# Altium PCB 2026.11.05.HMS.PD.CNHH.V5.1.PcbDoc (part 3 of 4)
Units mm, origin at the board's own origin, x right, y up, seen from the top; angles counter-clockwise.
Board outline 110 x 110 mm, 2 copper layers (Top Layer, Bottom Layer); 170 components, 117 nets, 610 pads, 1348 vias.
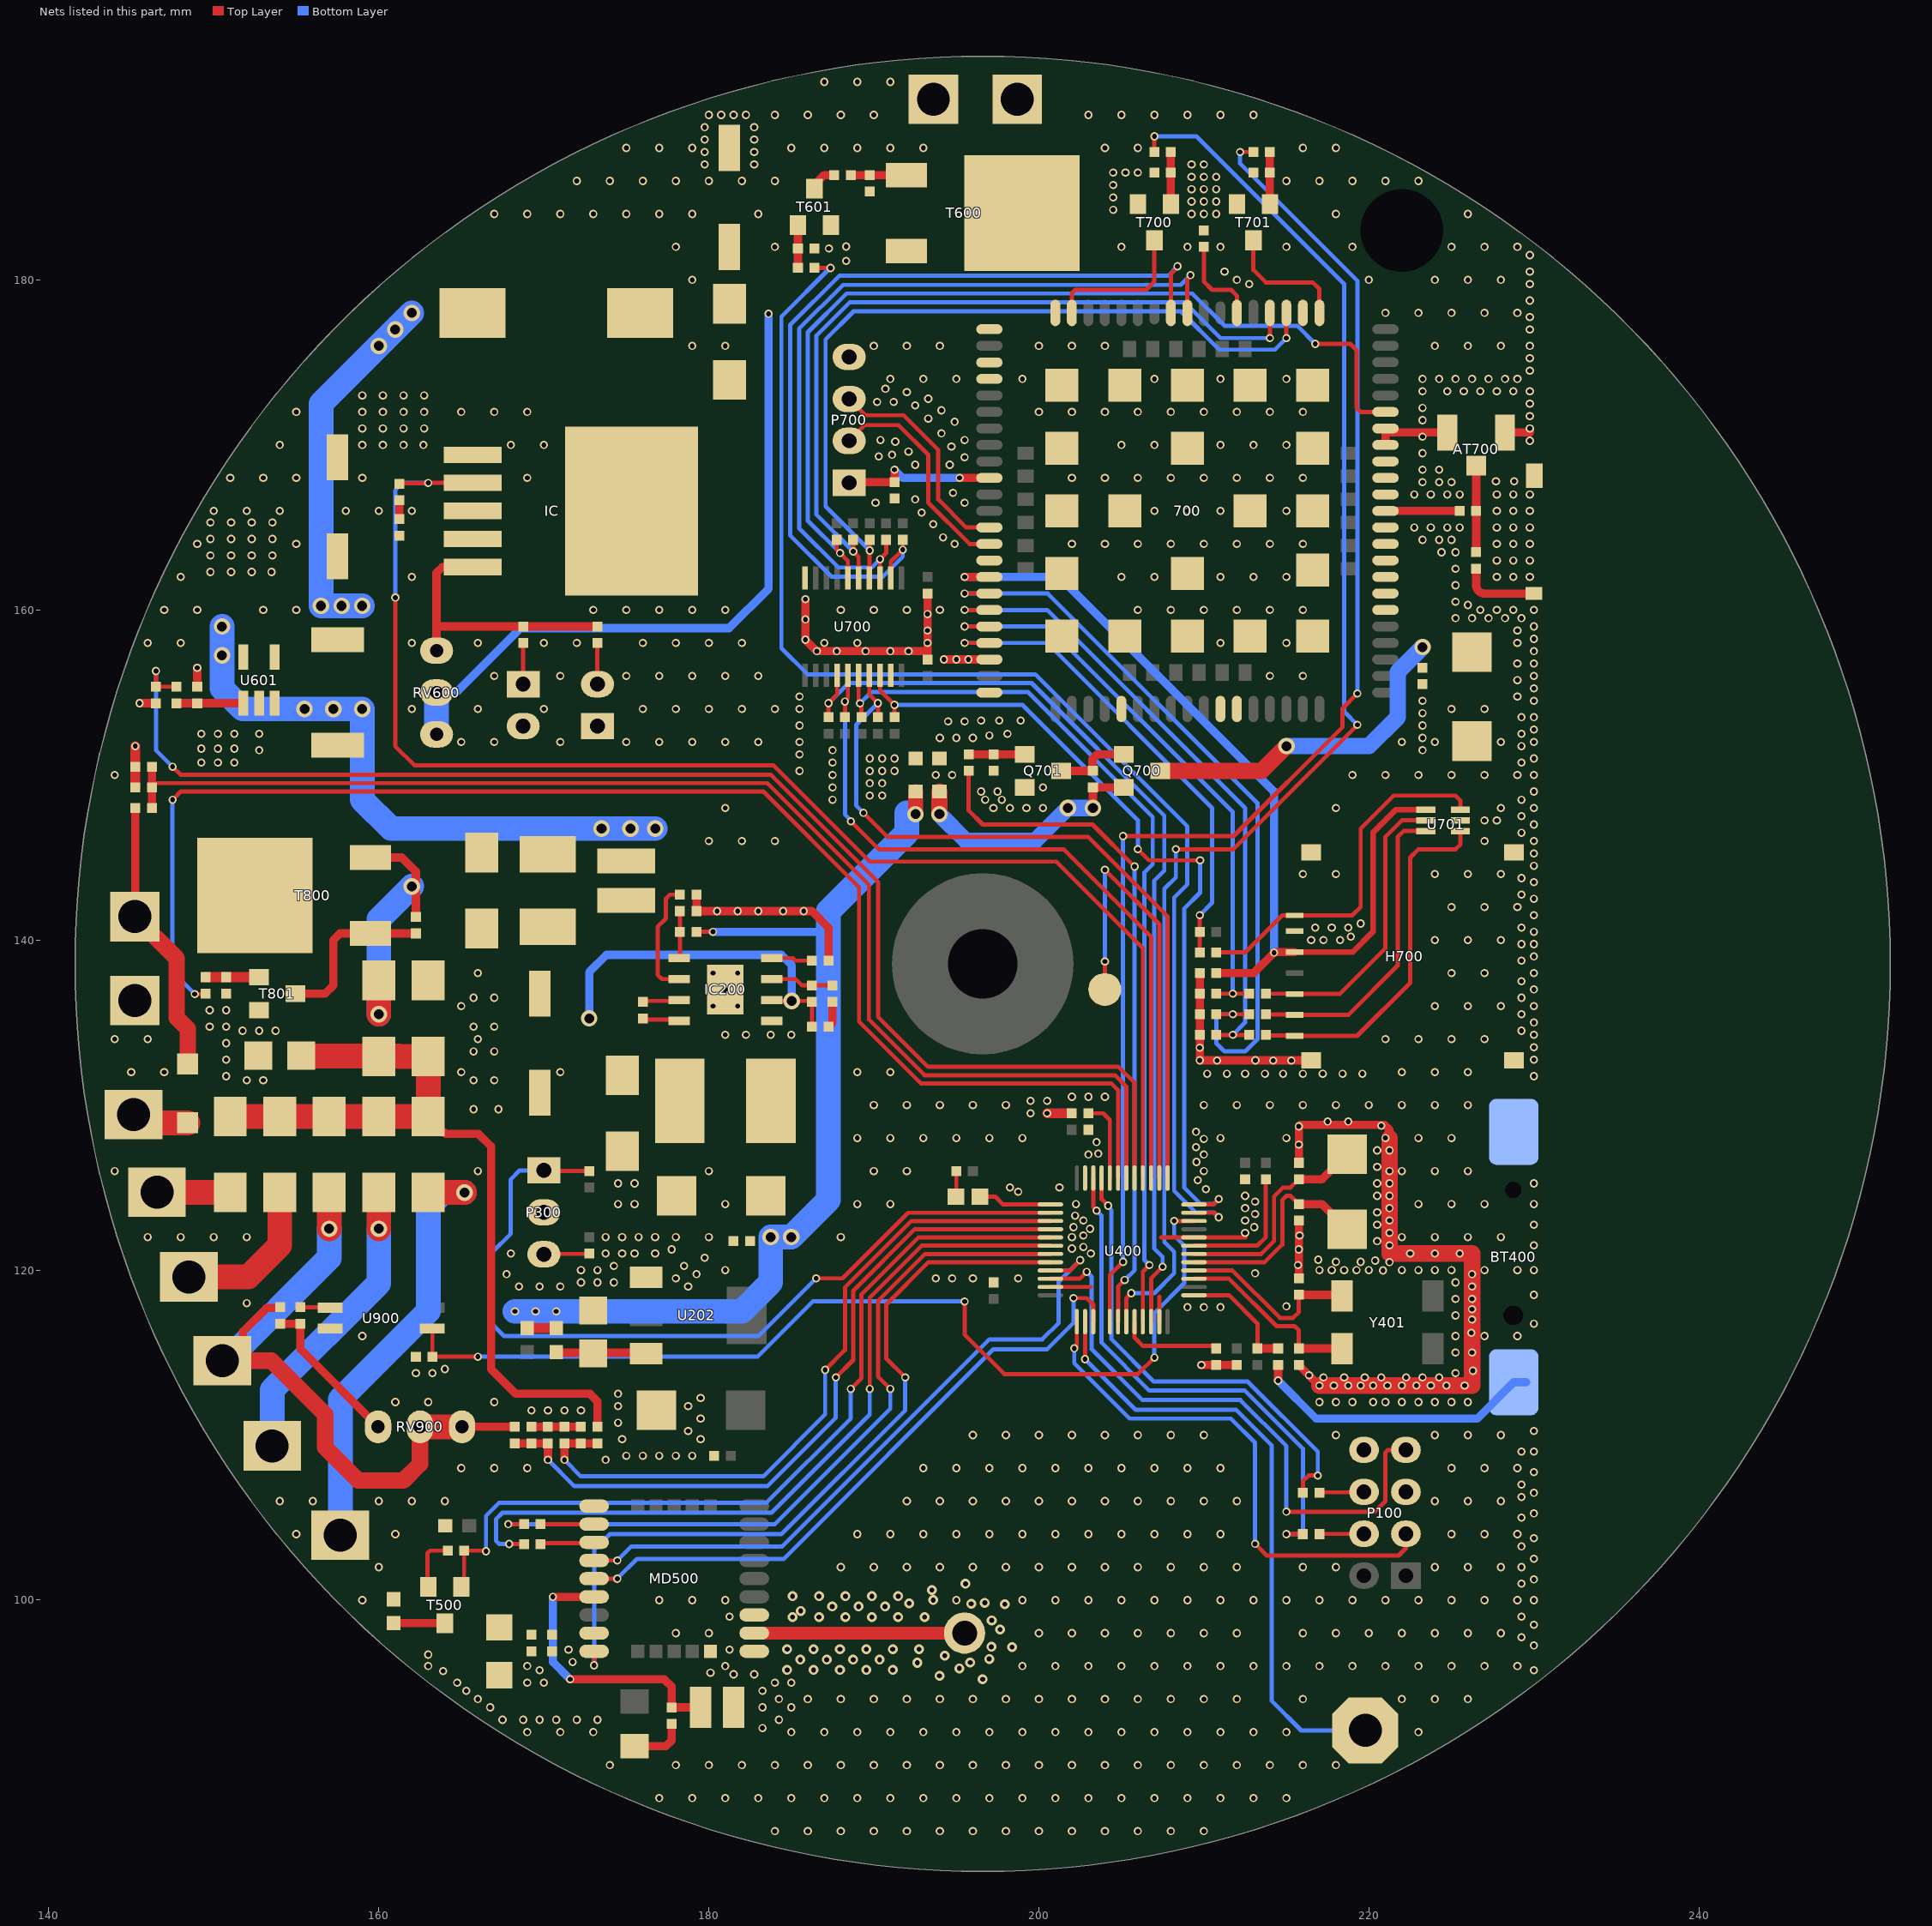
[diagram p2: the nets of this part, all layers, seen from the top]

## Via types
v1: diameter 0.5, hole 0.3, Top Layer to Bottom Layer, tented both sides, 1263 vias
v2: diameter 0.6, hole 0.3, Top Layer to Bottom Layer, tented both sides, 48 vias
v3: diameter 1, hole 0.6, Top Layer to Bottom Layer, tented both sides, 37 vias

## Nets (pads, with @x,y where several pads share a name; then routed paths per layer and width w, separated by ;. In a path a pad name is that pad's centre, name@x,y a point inside that pad or via, vN(x,y) a via of type N, cw(c..) or ccw(c..) an arc to the next point about the centre after c; other vN are vias at no path point) (continued)
GND: BT400.2 C201.1 C202.1 C203.2 C204.2 C205.1 C208.1 C209.2 C400.1 C401.1 C402.1 C403.1 C404.1 C405.1 C406.1 C407.1 C500.1 C501.1 C502.2 C503.2 C600.2 C601.1 C602.2 C603.1 C801.1 C802.2 C803.1 C900.1 D200.1 D.1 IC200.1 IC200.EPAD IC.1 L701.1 MD500.1 MD500.10 MD500.12 MD500.28 P100.5 P100.8 P300.2 P600.2 P601.1 P602.2 P800.2 R201.1 R203.1 R204.1 R205.1 R400.1 R405.1 R605.1 R607.1 R620.1 R803.1 R804.1 R806.1 R901.1 R902.1 T601.2 T801.2 T905.1 U202.1 U400.8 U400.23 U400.35 U400.47 U601.2 U900.2 | length 81.5
  Top Layer w0.254: U400.35@200.7,118.975 203.15,118.975 ; U400.47@207.3,116.875 207.3,118.4 ; 207.4,121.975 U400.8@209.4,121.975 212.525,121.975
  Top Layer w0.5: v1(145.5,154.35) C603.1@146.5,154.35 ; R607.1@149,155.35 v1(149,156.5) ; C601.1@161.25,165.5 R620.1@161.25,166.65 ; C900.1@169.25,110.5 C801.1@172.25,110.5 ; R205.1@179.25,142.75 R203.1@179.25,141.75 v1(180.5,141.75) v1(181.75,141.75) v1(183,141.75) v1(184.5,141.75) v1(185.75,141.75) 186.25,141.75 187.25,140.75 R204.1@187.25,138.75 ; C205.1@187.25,134.75 187.5,135 R201.1@187.5,136.25 ; v1(209.85,114.25) R400.1@210.75,114.25 C407.1@212,114.25 ; C403.1@215.75,114.25 v1(217,113) ; C404.1@215.75,119.5 C401.1@215.75,123 ; C400.1@215.75,126.5 v1(215.75,128.707) 215.843,128.8 220.957,128.8 221.25,128.507 v1@221.25,128 ; v1(221.25,120.475) 221.25,121
  Top Layer w0.6: R804.1@145.25,149.25 C803.1@145.25,150.5 v1(145.25,151.75) ; v1(200.5,129.5) R405.1@202,129.5
  Top Layer w1: v1(217,113) v1(218.75,113) v1(220.25,113) v1(222,113) v1(223.75,113) 226.25,113 v1(226.25,117) v1(226.25,118.25) v1(226.25,119.75) 226.25,121 v1(225.5,121) v1(224,121) v1(222.5,121) 221.25,121 v1(221.25,121.5) v1(221.25,123) v1(221.25,124.5) v1(221.25,126) v1(221.25,127.25) v1@221.25,128
  Top Layer w1.5: T905.1@145.15,129.425 145.65,128.925 D.1@148.425,128.925
  other v1: 184,86 186,86 188,86 190,86 192,86 194,86 196,86 198,86 200,86 202,86 204,86 206,86 208,86 210,86 177,88 179,88 181,88 183,88 185,88 187,88 189,88 191,88 193,88 195,88 197,88 199,88 201,88 203,88 205,88 207,88 209,88 211,88 213,88 215,88 174,90 178,90 180,90 182,90 184,90 186,90 188,90 190,90 192,90 194,90 196,90 198,90 200,90 202,90 204,90 206,90 208,90 210,90 212,90 214,90 216,90 218,90 169,92 171,92 173,92 185,92 187,92 189,92 191,92 193,92 195,92 197,92 199,92 201,92 203,92 205,92 207,92 209,92 211,92 213,92 215,92 223,92 183.25,92.25 167.5,92.75 168.75,92.75 169.75,92.75 170.75,92.75 172,92.75 173.25,92.75 184.25,92.75 166.75,93.5 183.25,93.5 185,93.5 166,94 184.25,94 186,94 188,94 190,94 192,94 194,94 196,94 198,94 200,94 202,94 204,94 206,94 208,94 210,94 212,94 216,94 222,94 224,94 226,94 165.3,94.5 183.25,94.5 164.75,95 169,95 170,95 184,95 185,95 181.5,95.5 182.75,95.5 180.1,95.6 163.9,95.7 169.75,95.75 230,95.75 163,96 169,96 181,96 199,96 201,96 203,96 205,96 207,96 209,96 211,96 213,96 215,96 217,96 219,96 221,96 223,96 225,96 227,96 229,96 171.75,96.25 163,96.7 171.5,97 181.25,97 230,97.25 229.25,97.75 178,98 180,98 200,98 202,98 204,98 206,98 208,98 210,98 212,98 216,98 218,98 220,98 222,98 224,98 226,98 228,98 230,98.5 181.25,99 229.25,99 159,100 177,100 179,100 181,100 195,100 199,100 201,100 203,100 205,100 207,100 209,100 211,100 213,100 215,100 217,100 219,100 221,100 223,100 225,100 227,100 229,100 230,100 229.25,101 230,101.25 160,102 188,102 190,102 192,102 194,102 196,102 198,102 200,102 202,102 204,102 206,102 208,102 210,102 212,102 216,102 218,102 224,102 226,102 228,102 229.25,102 230,102.5 229.25,103.25 230,103.75 155,104 161,104 189,104 191,104 193,104 195,104 197,104 199,104 201,104 203,104 205,104 207,104 209,104 211,104 225,104 227,104 229,104 229.25,105 230,105.25 154,106 156,106 160,106 162,106 164,106 192,106 194,106 196,106 198,106 200,106 202,106 204,106 206,106 208,106 210,106 212,106 224,106 226,106 228,106 229.25,106.25 230,106.5 229.25,107 230,107.75 165,108 167,108 169,108 193,108 195,108 197,108 199,108 201,108 203,108 205,108 207,108 209,108 211,108 225,108 227,108 229,108 173.75,108.5 175,108.75 176,108.75 177,108.75 178,108.75 179,108.75 229.25,109 230,109 174.75,109.75 179.5,109.75 196,110 198,110 200,110 202,110 204,110 206,110 208,110 210,110 218,110 224,110 226,110 228,110 178.75,110.25 230,110.25 174.5,110.75 179.5,111 169.25,111.5 170.25,111.5 171.25,111.5 172.25,111.5 174.5,111.75 178.75,111.75 161,112 163,112 167,112 217,112 218,112 219,112 220.25,112 221,112 222,112 223,112 224,112 225,112 226,112 179.5,112.25 174.5,112.5 217.875,113 219.5,113 221.125,113 222.875,113 224.7,113 225.8,113 217.25,113.5 218.5,113.5 219.75,113.5 220.75,113.5 222.25,113.5 223.25,113.5 224.25,113.5 216.375,113.625 162.25,113.75 163.25,113.75 225.25,113.75 226.3,113.9 164,114 225.25,115 226.25,115 159,116 225.25,116 227,116 229,116 226.2,116.2 230,116.75 225.25,117.25 226.25,117.625 209,117.75 210,117.75 211,117.75 215,117.8 152,118 225.25,118.25 230,118.5 168.5,119 169.75,119 171,119 178.75,119 226.25,119 172.25,119.25 173.25,119.25 174.25,119.25 225.25,119.25 178,119.5 193.75,119.5 194.75,119.5 196,119.5 198.75,119.5 167.75,119.75 179.25,119.75 213.1,119.8 220.85,119.975 172.25,120 173.25,120 181,120 217,120 217.75,120 218.5,120 219.25,120 220,120 222,120 223,120 224,120 225,120 227,120 229,120 230,120 174.25,120.25 178.5,120.25 215.7,120.3 218,120.5 219.5,120.5 220.375,120.575 216.925,120.625 179.75,120.75 168,121 173.75,121 174.75,121 175.5,121 176.75,121 203.15,121 177.75,121.25 215.75,121.25 202,121.3 202.7,121.4 230,121.5 220.5,121.75 146,122 148,122 150,122 152,122 173.75,122 174.75,122 175.75,122 176.75,122 178,122 180,122 188,122 202,122 222,122 224,122 226,122 228,122 202.7,122.1 215.8,122.1 212.5,122.25 221.25,122.25 203.1,122.5 202.1,122.6 213.05,122.6 220.5,122.75 230,122.75 202.7,123 212.5,123 202.2,123.3 213.1,123.4 220.5,123.5 212.5,123.75 221.25,123.75 174.5,124 175.5,124 181,124 189,124 191,124 202.25,124 223,124 225,124 227,124 230,124 213.1,124.15 212.5,124.5 220.5,124.5 198.75,124.75 210.125,124.9 198.25,125 201.25,125 174.5,125.25 175.5,125.25 220.5,125.25 221.25,125.25 230,125.25 209.625,125.45 144,126 166,126 180,126 190,126 192,126 210,126 222,126 224,126 226,126 220.5,126.25 209.55,126.55 203,127 210,127 203.6,127.05 220.5,127.25 209.525,127.45 215.75,127.604 203.5,127.75 210,127.95 189,128 191,128 193,128 195,128 197,128 199,128 211,128 215,128 221,128 223,128 225,128 209.525,128.375 220.75,128.75 217.5,129 218.75,129 199.5,129.5 165.75,129.75 167.25,129.75 190,130 192,130 194,130 196,130 198,130 210,130 212,130 214,130 216,130 218,130 220,130 222,130 224,130 226,130 199.5,130.25 200.5,130.25 202,130.5 203,130.5 204,130.5 152,131.5 153,131.5 165.75,131.5 167,131.5 150.75,131.75 145,132 147,132 165,132 171,132 189,132 191,132 150.75,132.75 165.75,133.25 167,133.25 150.75,133.75 144,134 146,134 166,134 181,134.25 182.25,134.25 183.75,134.25 185,134.25 151.75,134.5 152.75,134.5 153.75,134.5 149.75,134.75 150.75,134.75 165.75,134.75 167,134.75 149.75,135.75 150.75,135.75 165,136 180.25,136 181.75,136 165.75,136.5 167,136.5 181,137 166,138 180.25,138 181.75,138 180,146 182,146 184,146 181,148 187.5,148.5 189.75,148.75 190.5,148.75 187.5,149.25 189.75,149.5 190.5,149.5 144,150 187.5,150 185.5,150.25 189.75,150.25 190.5,150.25 191.25,150.25 149.25,150.75 150.25,150.75 151.25,150.75 187.5,150.75 189.75,151 190.5,151 191.25,151 185.5,151.25 152.75,151.5 187.5,151.5 149.25,151.6 150.25,151.6 151.25,151.6 165,152 167,152 171,152 175,152 177,152 179,152 181,152 183,152 185.5,152 149.25,152.5 150.25,152.5 151.25,152.5 152.75,152.5 185.5,153 162,154 166,154 170,154 176,154 178,154 180,154 182,154 184,154 185.5,154 185.5,154.75 167,156 171,156 175,156 177,156 179,156 181,156 183,156 146,158 148,158 162,158 166,158 170,158 172,158 176,158 178,158 180,158 182,158 147,160 149,160 153,160 155,160 173,160 175,160 177,160 179,160 181,160 148,162 162,162 149.8,162.3 151.05,162.3 152.3,162.3 153.5,162.3 149.8,163.3 151.05,163.3 152.3,163.3 153.55,163.3 149,164 155,164 149.8,164.3 151.05,164.3 152.3,164.3 153.55,164.3 149.8,165.3 151.05,165.3 152.3,165.3 153.55,165.3 150,166 152,166 154,166 158,166 160,166 162,166 151,168 153,168 155,168 159,168 169,168 154,170 159,170 160.25,170 161.5,170 162.7,170 168,170 170,170 159,171 160.25,171 161.5,171 162.75,171 155,172 159,172 160.25,172 161.5,172 162.75,172 165,172 167,172 169,172 159,173 160.25,173 161.5,173 162.75,173 179,176 181,176 179,180 188.325,181.15 187.275,181.9 178,182 184,182 188.325,182.025 167,184 169,184 171,184 173,184 175,184 177,184 179,184 183,184 172,186 174,186 176,186 178,186 180,186 182,186 184,186 179.75,187 182.75,187 179.75,187.75 182.75,187.75 175,188 177,188 179,188 185,188 187,188 189,188 191,188 193,188 179.75,188.5 182.75,188.5 179.75,189.25 182.75,189.25 180,190 180.75,190 181.5,190 182.25,190 184,190 186,190 188,190 190,190 187,192 189,192 191,192
  other v2: 196.596,95.204 193.976,95.416 184.745,95.766 186.345,95.766 187.945,95.766 189.545,95.766 191.145,95.766 195.178,95.861 192.64,96.204 195.84,96.214 185.545,96.39 187.145,96.39 188.745,96.39 190.345,96.39 196.991,96.433 194.297,96.636 184.745,97.027 186.345,97.027 187.945,97.027 189.545,97.027 191.145,97.027 192.745,97.027 198.383,97.154 197.122,97.172 197.652,98.216 197.145,98.772 185.078,98.973 186.678,98.973 188.278,98.973 189.878,98.973 191.478,98.973 193.078,98.973 185.564,99.345 187.478,99.61 189.078,99.61 190.678,99.61 197.937,99.753 195.9,99.778 192.14,99.806 196.724,99.837 193.601,100.001 185.078,100.234 186.678,100.234 188.278,100.234 189.878,100.234 191.478,100.234 193.516,100.613 195.554,100.991
GPS_PWR: L501.1 L502.2 R503.2 T500.2 | length 3.2
  Top Layer w0.254: T500.2@163,100.8 162.95,100.85 162.95,102.851 163.099,103 R503.2@164,103
GPS_VCC: C500.2 C501.2 C502.1 L501.2 MD500.8 T500.3 | length 3.1
  Top Layer w0.5: L501.2@160.9,98.6 T500.3@164,98.6
GSM.DTR: 700.3 R719.1 U700.4 | length 47.6
  Top Layer w0.254: U700.4@189.725,161.95 189.737,161.962 189.737,164.238 R719.1@189.75,164.25 ; v1(215,176.475) 700.3@215,178
  Bottom Layer w0.254: v1(189.75,163.6) 187.075,166.275 187.075,176.4 188.775,178.1 208.6,178.1 210.925,175.775 214.3,175.775 v1(215,176.475)
GSM.GND: 700.2 700.17 700.18 700.29 700.39 700.45 700.46 700.54 700.58 700.59 700.61 700.62 700.63 700.64 700.65 700.69 700.70 700.71 700.72 700.73 700.74 700.75 700.76 700.77 700.78 700.79 700.80 700.81 700.82 700.83 700.84 700.85 700.86 700.87 700.88 700.89 700.91 700.92 700.94 AT700.2 AT701.2 C701.2 C703.1 C704.1 C705.1 C706.1 C707.1 C708.1 C709.1 C730.2 H700.5 L701.2 P700.4 Q701.2 R700.1 R707.1 R709.2 R711.2 T700.2 T701.2 U700.10 U700.19 U701.2 | length 35.2
  Top Layer w0.5: v1(185.85,160.65) v1(185.85,158.2) v1(186.55,157.5) v1(191,157.5) 193.2,157.5 193.25,157.55 ; C705.1@193.25,157 193.25,157.55 ; C704.1@193.25,161 193.25,157.55 ; v1(194.25,157) 700.92@197,157 ; C706.1@209.75,138 C707.1@209.75,136.75 C709.1@209.75,135.5 C708.1@209.75,134.25 v1(209.75,132.71) H700.5@216.5,132.71 ; 700.64@221,170 221,170.75 AT700.2@224.75,170.75 ; AT700.2@228.25,170.75 229.75,170.75 v1(229.75,171)
  other v1: 230,131.75 210.2,131.9 211.4,131.9 212.5,131.9 213.7,131.9 214.8,131.9 216,131.9 217.2,131.9 218.4,131.9 219.6,131.9 222,132 224,132 226,132 210.8,132.7 214.2,132.7 215.3,132.7 213.125,132.71 230,132.75 209.75,133.48 230,133.5 221,134 223,134 225,134 227,134 230,134.25 229.25,134.5 230,135 229.25,135.5 224,136 226,136 228,136 230,136 229.25,136.5 230,137 229.25,137.5 225,138 227,138 230,138 229.25,138.75 230,139 229.25,139.75 230,139.75 216.5,140 217.25,140 218.25,140 224,140 226,140 228,140 218.9,140.2 230,140.5 216.75,140.75 217.75,140.75 218.75,140.75 229.25,140.75 219.5,141 230,141.5 225,142 227,142 229,142 230,142.5 229.25,142.75 230,143.5 229.25,143.75 216,144 218,144 224,144 226,144 228,144 230,144.5 230,145.25 227,146 230,146 229.25,146.5 230,147 227,147.25 227.75,147.25 229.25,147.5 197.25,148 198.25,148 199.25,148 200.25,148 218,148 228,148 230,148 196.75,148.5 197.75,148.5 229.25,148.5 196.5,149 197.5,149 230,149 200.25,149.25 193.75,150 194.75,150 219,150 221,150 223,150 225,150 227,150 229,150 230,150 229.25,150.75 230,151 223.25,151.5 229.25,151.75 222,152 224,152 228,152 230,152 194,152.25 195,152.25 196,152.25 223.25,152.25 197,152.4 198.1,152.5 229.25,152.5 230,152.75 223.25,153 194.5,153.25 195.5,153.25 196.5,153.3 197.6,153.3 198.9,153.3 229.25,153.5 230,153.5 223.25,153.75 225,154 227,154 223.25,154.5 230,154.5 229,154.75 230,155.25 229,155.75 214,156 216,156 230,156 229,156.75 230,156.75 195,157 195.725,157 187.75,157.5 189.5,157.5 192.1,157.5 230,157.5 187,158 189,158 193.25,158 211,158 215,158 229,158 230,158.25 193.25,158.75 229,158.75 230,159 185.85,159.425 225.25,159.5 226.25,159.5 227.25,159.5 228.25,159.5 229.25,159.5 193.25,159.75 188,160 190,160 192,160 194,160 206,160 208,160 210,160 212,160 214,160 216,160 226.75,160 227.75,160 228.75,160 230,160 226,160.3 225.25,160.5 225.25,161.5 205,162 207,162 211,162 213,162 215,162 227.75,162 228.75,162 229.75,162 225.25,162.5 227.75,163 228.75,163 229.75,163 224.4,163.5 225.25,163.5 194.9,164 202,164 204,164 206,164 208,164 210,164 212,164 214,164 216,164 227.75,164 228.75,164 229.75,164 223.25,164.25 224.25,164.25 225,164.25 194.2,164.4 222.75,165 223.75,165 224.75,165 225.5,165 227.75,165 228.75,165 229.75,165 193.6,165.2 192.9,165.9 207,166 209,166 211,166 215,166 227.75,166 228.75,166 229.75,166 190.1,166.5 195.5,166.5 192.5,166.7 222.75,167 223.75,167 224.75,167 225.5,167 227.75,167 228.75,167 229.75,167 194.8,167.1 223.25,167.75 224.25,167.75 225,167.75 227.7,167.8 228.8,167.8 202,168 204,168 206,168 208,168 210,168 212,168 214,168 216,168 223.25,168.5 224.25,168.5 192.5,168.8 194.6,168.8 195.5,169.25 190.3,169.3 191.1,169.4 223.25,169.5 192.1,169.6 194.7,169.9 205,170 207,170 211,170 213,170 215,170 191.3,170.2 229.75,170.25 190.4,170.3 195.5,170.3 223.25,170.5 194.1,170.7 194.9,171.4 223.25,171.5 193.3,171.6 229.75,171.75 200,172 202,172 204,172 206,172 208,172 210,172 212,172 214,172 216,172 194.1,172.1 223.25,172.25 192.5,172.4 229.75,172.5 190.2,172.6 191.2,172.6 193.3,172.8 192,173.2 223.25,173.25 224.75,173.25 225.75,173.25 226.75,173.25 227.75,173.25 228.75,173.25 229.75,173.25 190.7,173.4 191,174 193,174 195,174 199,174 207,174 211,174 215,174 223.25,174 224.25,174 225.25,174 226.25,174 227.25,174 228.25,174 229,174 229.75,174.5 229.75,175.25 190,176 192,176 194,176 200,176 202,176 204,176 224,176 226,176 228,176 229.75,176 229.75,177 229.75,177.75 221,178 223,178 225,178 227,178 229,178 229.75,178.75 212.75,179.75 229.75,179.75 212,180 220,180 224,180 226,180 228,180 211.25,180.5 229.75,180.5 229.75,181.5 205,182 209,182 211,182 215,182 219,182 225,182 227,182 229,182 209.25,184 210,184 210.75,184 218,184 226,184 204.5,184.25 209.25,184.75 210,184.75 210.75,184.75 204.5,185 209.25,185.5 210,185.5 210.75,185.5 204.5,185.75 215,186 217,186 219,186 221,186 223,186 209.25,186.25 210,186.25 210.75,186.25 204.5,186.5 205.25,186.5 206,186.5 209.25,187 210,187 204,188 206,188 216,188 218,188 203,190 205,190 207,190 209,190 211,190 213,190
GSM.PWR: L700.2 Q700.2 R705.2 | length 15.3
  Top Layer w0.5: R705.2@203.25,149.25 Q700.2@205.15,149.25 ; v3(203.275,148) R705.2@203.275,149.25
  Top Layer w1: v3(193.973,147.627) L700.2@193.973,149
  Bottom Layer w1: v3(193.973,147.627) 195.6,146 199.75,146 v3(201.75,148) v3@203.25,148
GSM.PWRKEY: 700.1 T701.3 | length 7.7
  Top Layer w0.254: T701.3@213,182.4 213,180.6 213.75,179.85 216.6,179.85 217,179.45 700.1@217,178
GSM.RESET: 700.16 T700.3 | length 9
  Top Layer w0.254: 700.16@202,178 202,179.2 202.2,179.4 206.5,179.4 207,179.9 T700.3@207,182.4
GSM.RI: 700.4 R717.1 U700.5 | length 47.2
  Top Layer w0.254: R717.1@188.75,164.25 v1(188.75,163.55) 189.075,163.225 U700.5@189.075,161.95 ; v1(214,176.475) 700.4@214,178
  Bottom Layer w0.254: v1(188.75,163.55) 186.525,165.775 186.525,176.628 188.547,178.65 208.828,178.65 211.003,176.475 v1(214,176.475)
GSM.Status: 700.66 R718.1 U700.6 | length 57.8
  Top Layer w0.254: R718.1@187.75,164.25 187.75,163.65 v1(187.95,163.45) 188.425,162.975 U700.6@188.425,161.95 ; v1(216.75,176.125) 218.875,176.125 219.25,175.75 219.25,172.25 219.5,172 700.66@221,172
  Bottom Layer w0.254: v1(187.95,163.45) 186,165.4 186,176.825 188.35,179.175 209.3,179.175 211.25,177.225 215.65,177.225 v1(216.75,176.125)
GSM.VBAT: 700.55 700.56 700.57 C703.2 C730.1 Q700.3 | length 20.6
  Top Layer w1: Q700.3@207.35,150.25 213.5,150.25 v3(215,151.75)
  Bottom Layer w1: v3(215,151.75) 220,151.75 221.75,153.5 221.75,156.25 v3(223.25,157.75)
LED: D400.2 U400.25 | length 4.5
  Top Layer w0.254: D400.2@196.425,124.45 197.35,124.45 197.825,123.975 U400.25@200.7,123.975
LED_PWR: C600.1 D600.2 R602.2 RV600.2 RV600.3 T600.3 | length 41.9
  Bottom Layer w0.5: RV600.2@163.5,155 163.596,155.096 164.796,155.096 168.6,158.9 181.225,158.9 183.625,161.3 v1(183.625,177.95)
  Bottom Layer w1.5: RV600.3@163.5,152.46 RV600.2@163.5,155
LED_VCC: C601.2 C602.1 IC.4 L601.1 R603.2 U601.4 | length 22.5
  Bottom Layer w1.5: v3(159,160.25) v3(157.75,160.25) v3(156.5,160.25) 156.5,172.5 v3(162,178)
  other v3: 160,176 161,177
Net700_60: 700.60 C700.2 | length 4.5
  Top Layer w0.5: 700.60@221,166 C700.2@225.5,166
Net`_2: `.2 P300.3 | length 2.8
  Top Layer w0.254: P300.3@170,120.96 170.02,120.98 172.73,120.98 `.2@172.75,121
NetAT500_1: AT500.1 MD500.11 | length 12.8
  Top Layer w0.8: MD500.11@182.75,98 AT500.1@195.5,98
NetAT700_1: AT700.1 C700.1 R777.2 | length 8
  Top Layer w0.35: C700.1@226.5,166 AT700.1@226.5,168.75
  Top Layer w0.5: R777.2@226.5,163.5 C700.1@226.5,166 AT700.1@226.5,168.75
NetAT701_1: AT701.1 R777.1 | length 4.8
  Top Layer w0.5: R777.1@226.5,162.5 226.5,161.5 ccw(c227,161.5) 227,161 AT701.1@230,161
NetC200_1: C200.1 D200.2 IC200.8 L201.1 | length 2.3
  Top Layer w0.254: C200.1@176,135.25 176.077,135.173 178.119,135.173 IC200.8@178.196,135.095
NetC200_2: C200.2 IC200.7 | length 2.2
  Top Layer w0.254: C200.2@176,136.25 176.057,136.308 178.139,136.308 IC200.7@178.196,136.365
NetC201_2: C201.2 L202.2 U202.3 | length 5.5
  Top Layer w0.5: L202.2@170.75,115.027 170.789,114.989 176.163,114.989 U202.3@176.202,114.95
NetC204_1: C204.1 C205.2 IC200.2 L200.2 R200.2 | length 21.9
  Top Layer w0.254: IC200.2@183.803,136.365 183.861,136.307 v3(185.027,136.307) 186.192,136.307 R200.2@186.25,136.25 C205.2@186.25,134.75
  Bottom Layer w0.5: v3(172.75,135.25) 172.75,138.05 173.8,139.1 184.4,139.1 185.027,138.473 v3(185.027,136.307)
NetC503_1: C503.1 MD500.6 R502.1 | length 17.3
  Top Layer w0.5: v1(170.55,100.2) MD500.6@173.05,100.2 ; v1(171.6,95.2) 177.3,95.2 177.75,94.75 R502.1@177.75,93.5 C503.1@179.5,93.5
  Bottom Layer w0.5: v1(170.55,100.2) 170.55,96.25 v1(171.6,95.2)
NetC603_2: C603.2 R606.2 U400.17 | length 85.2
  Top Layer w0.254: v1(146.5,156.3) C603.2@146.5,155.35 R606.2@147.75,155.35 ; v1(147.5,150.5) 147.984,150.016 148.4,150.016 183.484,150.016 183.759,150.016 190.25,143.525 190.25,135.35 193.284,132.316 204.821,132.316 205.8,131.337 U400.17@205.8,125.575
  Bottom Layer w0.254: v1(146.5,156.3) 146.5,151.5 v1(147.5,150.5)
NetC801_2: C801.2 R800.1 R803.2 U400.27 | length 43.1
  Top Layer w0.254: v1(187.052,113.952) 188.25,115.15 188.25,118.943 192.282,122.975 U400.27@200.7,122.975
  Top Layer w0.5: v1(171.25,108.5) R803.2@171.25,109.5 R800.1@173.25,109.5
  Bottom Layer w0.254: v1(171.25,108.5) 172.25,107.5 183.3,107.5 187.052,111.252 v1(187.052,113.952)
NetC803_2: C803.2 R802.1 R804.2 U400.18 | length 79.5
  Top Layer w0.254: R804.2@146.25,149.508 182.992,149.508 183.542,149.508 189.7,143.35 189.7,135.182 193.074,131.808 204.61,131.808 205.3,131.118 U400.18@205.3,125.575
  Top Layer w0.5: R802.1@146.25,148 146.25,148.5 146.25,149.508 C803.2@146.25,150.5
NetC900_2: C900.2 R900.1 R901.2 U400.28 | length 44.5
  Top Layer w0.254: v1(187.696,113.496) 188.75,114.55 188.75,118.736 192.489,122.475 U400.28@200.7,122.475
  Top Layer w0.5: R900.1@168.25,109.5 R901.2@170.25,109.5 v1(170.25,108.5)
  Bottom Layer w0.254: v1(170.25,108.5) 171.85,106.9 183.549,106.9 187.696,111.048 v1(187.696,113.496)
NetD400_1: D400.1 R404.2 | length 1.6
  Top Layer w0.254: D400.1@194.975,124.45 195,124.475 R404.2@195,126
NetD500_2: D500.2 R502.2 | length 3.4
  Top Layer w0.5: D500.2@175.5,91.15 177.4,91.15 177.75,91.5 R502.2@177.75,92.5
NetD600_1: D600.1 IC.3 IC.6 L601.2
NetD800_2: D800.2 R801.2 T800.3 | length 16.5
  Top Layer w0.5: T800.3@159.5,145 161.4,145 162.25,144.15 R801.2@162.25,141.4
  Top Layer w1.5: v3(160,135.5) D800.2@160,137.55
  Bottom Layer w1.5: v3(160,135.5) 160,141.25 v3(162,143.25)
NetD900_1: D900.1 T900.1 | length 4.4
  Top Layer w1.5: T900.1@146.558,124.714 146.565,124.707 150.993,124.707 D900.1@151,124.7
NetD902_1: D902.1 T901.1 | length 9.5
  Top Layer w1.5: T901.1@148.488,119.583 152.083,119.583 154,121.5 D902.1@154,124.7
NetD905_1: D905.1 T903.1 | length 18
  Top Layer w1.5: v3(160,122.5) D905.1@160,124.7
  Bottom Layer w1.5: T903.1@153.543,109.347 153.543,112.743 160,119.2 v3(160,122.5)
NetD906_1: D906.1 T904.1 | length 26.9
  Top Layer w1.5: D906.1@163,124.7 v3(165.2,124.7)
  Bottom Layer w1.5: T904.1@157.671,103.937 157.671,112.17 163,117.5 163,123.821 163.879,124.7 v3(165.2,124.7)
NetH700_2: H700.2 R712.2 U701.5 | length 18
  Top Layer w0.254: R712.2@213.75,136.75 215.48,136.75 H700.2@215.5,136.73 218.23,136.73 221,139.5 221,146.25 222,147.25 U701.5@223.45,147.25
NetH700_3: H700.3 R713.2 U701.1 | length 21.9
  Top Layer w0.254: R713.2@213.75,134.25 213.78,134.22 215.47,134.22 H700.3@215.5,134.19 219.282,134.19 222.5,137.408 222.5,145 223,145.5 225.25,145.5 225.55,145.8 U701.1@225.55,146.6
NetH700_7: H700.7 R715.2 U701.6 | length 18.9
  Top Layer w0.254: R715.2@213.75,135.5 213.77,135.48 215.48,135.48 H700.7@215.5,135.46 218.756,135.46 221.75,138.454 221.75,146.25 222.1,146.6 U701.6@223.45,146.6
NetH700_8: H700.8 R714.2 U701.3 | length 22.2
  Top Layer w0.254: R714.2@210.75,139.25 212.5,139.25 214.74,141.49 H700.8@215.5,141.49 218.99,141.49 219.5,142 219.5,146.75 221.5,148.75 225.25,148.75 225.55,148.45 U701.3@225.55,147.9
NetIC200_3: IC200.3 R200.1 R201.2 | length 3.9
  Top Layer w0.254: IC200.3@183.803,137.635 185.265,137.635 185.65,137.25 R201.2@187.5,137.25
NetIC200_4: IC200.4 R204.2 | length 2.5
  Top Layer w0.254: IC200.4@183.803,138.905 185.095,138.905 185.25,138.75 R204.2@186.25,138.75
NetIC200_5: IC200.5 R202.1 R203.2 | length 2.9
  Top Layer w0.254: IC200.5@178.196,138.905 178.25,138.959 R203.2@178.25,141.75
NetIC200_6: IC200.6 R205.2 | length 7.2
  Top Layer w0.254: IC200.6@178.139,137.692 IC200.6@178.196,137.635 177.165,137.635 176.9,137.9 176.9,140.8 177.4,141.3 177.4,142.5 177.65,142.75 R205.2@178.25,142.75
NetIC_2: IC.2 R620.2 U400.16 | length 86.4
  Top Layer w0.254: v1(161,160.75) 161,151.75 162.175,150.575 183.925,150.575 189.75,144.75 201.05,144.75 206.3,139.5 U400.16@206.3,125.575 ; R620.2@161.25,167.65 161.275,167.675 162.975,167.675 v1(163,167.7) IC.2@165.685,167.7
  Bottom Layer w0.254: v1(161,160.75) 161,167.25 161.45,167.7 v1(163,167.7)
NetIC_5: IC.5 R600.2 R601.2 RV600.1 | length 17.1
  Top Layer w0.5: RV600.1@163.5,157.54 163.5,159 ; IC.5@165.435,162.35 IC.5@165.685,162.6 163.85,162.6 163.5,162.25 163.5,159 ; R600.2@173.25,159 163.5,159
NetMD500_2: MD500.2 R500.1 | length 3.3
  Top Layer w0.254: R500.1@169.8,104.6 MD500.2@173.05,104.6
NetMD500_3: MD500.3 R501.1 | length 3.3
  Top Layer w0.254: R501.1@169.8,103.4 169.85,103.45 173,103.45 MD500.3@173.05,103.5
NetMD500_4: MD500.4 U400.33 | length 40.5
  Top Layer w0.254: MD500.4@173.05,102.4 v1(174.457,102.4) ; U400.33@200.7,119.975 201.875,119.975 v1(202.5,120.6)
  Bottom Layer w0.254: v1(174.457,102.4) 175.307,103.25 184.45,103.25 197,115.8 200.2,115.8 201.2,116.8 201.2,119.3 v1(202.5,120.6)
NetMD500_5: MD500.5 U400.39 | length 39.4
  Top Layer w0.254: MD500.5@173.05,101.3 v1(174.457,101.3) ; v1(202.1,118.3) 202.9,118.3 203.3,117.9 U400.39@203.3,116.875
  Bottom Layer w0.254: v1(174.457,101.3) 175.657,102.5 184.549,102.5 197.249,115.2 200.5,115.2 202.1,116.8 v1(202.1,118.3)
NetMD500_9: MD500.9 U400.32 | length 48.2
  Top Layer w0.254: v1(173.05,96.05) MD500.9@173.05,96.9 ; v1(191.9,113.496) 190.75,114.646 190.75,117.907 193.318,120.475 U400.32@200.7,120.475
  Bottom Layer w0.254: v1@173.05,95.95 v1(173.05,96.05) 173.05,103.05 174,104 184.4,104 191.9,111.5 v1(191.9,113.496)
NetP100_3: P100.3 U400.37 | length 32.2
  Top Layer w0.254: v1(202.146,115.254) 202.3,115.407 U400.37@202.3,116.875 ; v1(213.1,103.408) 213.808,102.7 221.8,102.7 222.24,103.14 P100.3@222.24,104.02
  Bottom Layer w0.254: v1(202.146,115.254) 202.146,114.354 205.5,111 211.635,111 213.1,109.535 v1(213.1,103.408)
NetP100_4: P100.4 R102.1 | length 2.7
  Top Layer w0.254: R102.1@217,104 217.01,104.01 219.69,104.01 P100.4@219.7,104.02
NetP100_6: P100.6 R100.1 | length 2.7
  Top Layer w0.254: R100.1@217,106.5 217.03,106.53 219.67,106.53 P100.6@219.7,106.56
NetP100_7: P100.7 U400.34 | length 35.9
  Top Layer w0.254: U400.34@200.7,119.475 202.475,119.475 v1(202.896,119.896) ; v1(215,105.354) 220.354,105.354 221,106 221,108.951 221.149,109.1 P100.7@222.24,109.1
  Bottom Layer w0.254: v1(202.896,119.896) 203.2,119.591 203.2,115.2 206.275,112.125 212.208,112.125 215,109.333 v1(215,105.354)
NetP300_1: P300.1 R300.1 U400.26 | length 51.4
  Top Layer w0.254: P300.1@170,126.04 170.04,126 R300.1@172.75,126 ; v1(186.5,119.5) 188.1,119.5 192.075,123.475 U400.26@200.7,123.475
  Bottom Layer w0.254: P300.1@170,126.04 168.54,126.04 168,125.5 168,122.2 166.9,121.1 166.9,116.7 167.6,116 183,116 v1(186.5,119.5)
NetP600_1: P600.1 T600.2
NetP601_2: P601.2 R600.1 | length 2.5
  Top Layer w0.254: P601.2@173.25,155.5 R600.1@173.25,158
NetP602_1: P602.1 R601.1 | length 2.5
  Top Layer w0.254: P602.1@168.75,155.5 R601.1@168.75,158
NetQ700_1: Q700.1@205.15,151.25 Q701.3 R705.1 | length 4.6
  Top Layer w0.5: Q701.3@201.35,150.25 203.25,150.25 203.25,150.957 203.543,151.25 Q700.1@205.15,151.25
NetQ701_1: Q701.1@199.15,151.25 R706.1 R707.2 | length 3.4
  Top Layer w0.5: R706.1@195.75,151.25 R707.2@197.25,151.25 Q701.1@199.15,151.25
NetR100_2: R100.2 U400.21 | length 28.5
  Top Layer w0.254: U400.21@203.8,125.575 203.8,124.3 v1(204.2,123.9) ; R100.2@216,106.5 216,107.2 216.35,107.55 v1(216.9,107.55)
  Bottom Layer w0.254: v1(204.2,123.9) 204.2,123.833 204.4,123.633 204.4,115.809 206.959,113.25 212.65,113.25 216.9,109 v1(216.9,107.55)
NetR102_2: R102.2 U400.22 | length 32
  Top Layer w0.254: U400.22@203.3,125.575 203.3,123.8 v1(203.5,123.6) ; v1(215,104) R102.2@216,104
  Bottom Layer w0.254: v1(203.5,123.6) 203.8,123.3 203.8,115.6 206.7,112.7 212.482,112.7 216,109.182 216,104.3 215.7,104 v1(215,104)
NetR400_2: R400.2 U400.44 | length 6.1
  Top Layer w0.254: U400.44@205.8,116.875 205.8,115.9 206.3,115.4 R400.2@210.75,115.4
NetR401_1: R401.1 U400.7 | length 8.1
  Top Layer w0.254: U400.7@209.4,121.475 213.225,121.475 213.75,122 R401.1@213.75,125.5
NetR402_2: R402.2 R403.2 U400.1 | length 7.3
  Top Layer w0.254: U400.1@209.4,118.475 211.525,118.475 213.25,116.75 R403.2@213.25,115.25
  Top Layer w0.5: R403.2@213.25,115.25 R402.2@214.5,115.25
NetR405_2: R405.2 U400.20 | length 5
  Top Layer w0.254: R405.2@203,129.5 203.9,129.5 204.3,129.1 U400.20@204.3,125.575
NetR500_2: R500.2 U400.31 | length 45.5
  Top Layer w0.254: v1(167.85,104.6) R500.2@168.8,104.6 ; v1(191,112.8) 190.25,113.55 190.25,118.114 193.111,120.975 U400.31@200.7,120.975
  Bottom Layer w0.254: v1(167.85,104.6) 184,104.6 191,111.6 v1(191,112.8)
NetR501_2: R501.2 U400.30 | length 47.7
  Top Layer w0.254: v1(167.9,103.4) R501.2@168.8,103.4 ; v1(189.75,112.8) 189.75,118.322 192.903,121.475 U400.30@200.7,121.475
  Bottom Layer w0.254: v1(167.9,103.4) 167.3,103.4 167.1,103.6 167.1,104.9 167.5,105.3 183.8,105.3 189.75,111.25 v1(189.75,112.8)
NetR503_1: R503.1 T500.1@165,100.8 U400.29 | length 51
  Top Layer w0.254: T500.1@165,100.8 165.175,100.975 R503.1@165.175,103 v1@166.5,103 ; v1(188.6,112.8) 189.25,113.45 189.25,118.529 192.696,121.975 U400.29@200.7,121.975
  Bottom Layer w0.254: v1(166.5,102.962) 166.5,105.1 167.3,105.9 183.5,105.9 188.6,111 v1(188.6,112.8)
NetR602_1: R602.1 R608.1 T600.1 | length 3.4
  Top Layer w0.5: R608.1@188.6,186.35 R602.1@189.75,186.35 T600.1@191.968,186.35
NetR604_1: R604.1 U400.11 | length 81.7
  Top Layer w0.254: R604.1@186.4,180.725 v1(187.375,180.725) ; U400.11@209.4,123.475 210.625,123.475 v1(210.9,123.2)
  Bottom Layer w0.254: v1(187.375,180.725) 187.35,180.725 184.4,177.775 184.4,157.675 185.975,156.1 199.775,156.1 209,146.875 209,143.375 208.2,142.575 208.2,124.8 209.5,123.5 210.6,123.5 v1(210.9,123.2)
NetR604_2: R604.2 R605.2 T601.1@185.4,183.325 | length 2.6
  Top Layer w0.5: R604.2@185.4,180.725 R605.2@185.4,181.9 T601.1@185.4,183.325
NetR606_1: R606.1 R607.2 U601.1 | length 4
  Top Layer w0.5: R606.1@147.75,154.35 R607.2@149,154.35 U601.1@151.8,154.35
NetR608_2: R608.2 T601.3 | length 1.7
  Top Layer w0.5: T601.3@186.4,185.525 186.4,185.775 186.975,186.35 R608.2@187.6,186.35
NetR703_1: R703.1 U400.12 U700.18 | length 50.9
  Top Layer w0.254: U700.18@190.375,156.05 190.375,155.125 v1(191.25,154.25) R703.1@191.25,153.5 ; v1(206,145.5) 206.67,144.83 v1(209.77,144.83) ; U400.12@209.4,123.975 210.575,123.975 v1(210.9,124.3)
  Bottom Layer w0.254: v1(191.25,154.25) 199.009,154.25 206,147.259 v1(206,145.5) ; v1(209.77,144.83) 209.77,142.87 208.8,141.9 208.8,125 209.8,124 210.6,124 v1(210.9,124.3)
NetR704_1: R704.1 U400.13 U700.17 | length 47
  Top Layer w0.254: v1(189.369,147.706) 190.825,146.25 202.975,146.25 207.8,141.425 U400.13@207.8,125.575 ; U700.17@189.725,156.05 189.725,154.875 v1(190.25,154.35) R704.1@190.25,153.5
  Bottom Layer w0.254: v1(189.369,147.706) 189.369,147.709 188.925,148.154 188.925,153.025 v1(190.25,154.35)
NetR706_2: R706.2 U400.42 | length 41.8
  Top Layer w0.254: R706.2@195.75,150.25 195.75,147.85 196.6,147 203.25,147 v1(205.8,144.45) ; U400.42@204.8,116.875 204.8,119 v1(205.2,119.4)
  Bottom Layer w0.254: v1(205.2,119.4) 205.8,120 v1(205.8,144.45)
NetR708_1: R708.1 R709.1 T700.1@208,184.6 | length 3.1
  Top Layer w0.5: T700.1@208,184.6 R709.1@208,186.5 R708.1@208,187.75
NetR708_2: R708.2 U400.43 | length 88.5
  Top Layer w0.254: U400.43@205.3,116.875 205.3,118.3 v1(205.6,118.6) ; R708.2@207,187.75 v1(207,188.7) ; v1(208.3,145.5) 211.778,145.5 219.3,153.022 v1(219.3,153.039)
  Bottom Layer w0.254: v1(205.6,118.6) 207,118.6 208.2,119.8 208.2,121.1 207.6,121.7 207.6,143.1 208.3,143.8 v1(208.3,145.5) ; v1(207,188.7) 209.55,188.7 218.5,179.75 218.5,153.839 v1(219.3,153.039)
NetR710_1: R710.1 R711.1 T701.1@214,184.6 | length 3.1
  Top Layer w0.5: T701.1@214,184.6 R710.1@214,187.75
NetR710_2: R710.2 U400.41 | length 84.8
  Top Layer w0.254: U400.41@204.3,116.875 204.3,119.7 v1(205.1,120.5) ; v1(205.1,146.3) 211.8,146.3 218.4,152.9 218.4,154.039 v1(219.3,154.939) ; v1(212.193,187.75) R710.2@213,187.75
  Bottom Layer w0.254: v1(205.1,120.5) v1(205.1,146.3) ; v1(212.193,187.75) 212.193,187.057 219.3,179.95 v1(219.3,154.939)
NetR720_1: R720.1 U400.45 U700.16 | length 54.9
  Top Layer w0.254: U700.16@189.075,156.05 189.075,154.425 189.25,154.25 R720.1@189.25,153.5 ; U400.45@206.3,116.875 206.3,119.9 v1(206.7,120.3)
  Bottom Layer w0.254: v1(189.163,154.338) 189.85,155.025 199.33,155.025 206.9,147.455 206.9,144.6 206.4,144.1 206.4,120.6 v1(206.7,120.3)
NetR721_1: R721.1 U400.15 U700.15 | length 45.7
  Top Layer w0.254: R721.1@188.25,153.5 v1(188.25,154.45) 188.425,154.625 U700.15@188.425,156.05 ; v1(188.61,147.19) 190.3,145.5 201.5,145.5 206.8,140.2 U400.15@206.8,125.575
  Bottom Layer w0.254: v1(188.25,154.45) 188.25,147.617 188.61,147.256 v1(188.61,147.19)
NetR722_1: R722.1 U400.46 U700.14 | length 58.4
  Top Layer w0.254: R722.1@187.25,153.5 v1(187.25,154.35) 187.775,154.875 U700.14@187.775,156.05 ; U400.46@206.8,116.875 206.8,119.5 v1(207.5,120.2)
  Bottom Layer w0.254: v1(187.25,154.35) 188.475,155.575 199.558,155.575 207.6,147.533 207.6,144.2 207,143.6 207,121.3 207.5,120.8 v1(207.5,120.2)
NetR801_1: R801.1 T800.1 T801.3 | length 10.4
  Top Layer w0.5: T801.3@154.95,136.75 156.75,136.75 157.25,137.25 157.25,140 157.65,140.4 T800.1@159.5,140.4 R801.1@162.25,140.4
NetR805_1: R805.1 U400.19 | length 88.1
  Top Layer w0.254: v1(147.5,148.5) 148,149 148.4,149 182.5,149 183.3,149 189.1,143.2 189.1,135.063 192.863,131.3 204.4,131.3 204.8,130.9 U400.19@204.8,125.575 ; v1(148.85,136.725) 149.475,136.725 R805.1@149.5,136.75
  Bottom Layer w0.254: v1(147.5,148.5) 147.5,138.075 v1(148.85,136.725)
NetR805_2: R805.2 R806.2 T801.1@152.75,137.75 | length 3.3
  Top Layer w0.6: R805.2@149.5,137.75 R806.2@150.75,137.75 T801.1@152.75,137.75
NetR902_2: R902.2 U400.10 U900.3 | length 60.6
  Top Layer w0.254: U900.3@163.246,116.448 163.25,116.444 R902.2@163.25,114.75 v1(166,114.75) ; v1(195.5,118.1) 195.5,116.1 197.9,113.7 206,113.7 v1(207,114.7) ; v1(208.2,122.975) U400.10@209.4,122.975
  Bottom Layer w0.254: v1(166,114.75) 182.95,114.75 186.3,118.1 v1(195.5,118.1) ; v1@207,114.8 207,117.4 208.8,119.2 208.8,121.5 208.2,122.1 v1(208.2,122.975)
NetR905_1: R905.1 U900.1 | length 1.8
  Top Layer w0.254: R905.1@155.25,117.75 155.266,117.734 157.03,117.734 U900.1@157.046,117.718
NetR905_2: R905.2 R.2 RV900.1 | length 9.4
  Top Layer w0.5: R.2@154.025,116.75 R905.2@155.25,116.75 155.25,115.21 RV900.1@159.96,110.5
NetT300_1: T300.1 U400.38 | length 37.6
  Top Layer w0.254: v1(202.8,114.6) U400.38@202.8,116.875
  Bottom Layer w0.254: v1(202.8,114.6) 205.875,111.525 211.959,111.525 214.1,109.384 214.1,93.9 215.9,92.1 T300.1@219.775,92.1
NetT400_1: T400.1 U400.14 | length 27.3
  Top Layer w0.254: T400.1@204,137 v1(204,138.7) ; v1(204,144.25) 207.3,140.95 U400.14@207.3,125.575
  Bottom Layer w0.254: v1(204,138.7) v1(204,144.25)
OSC32I: C403.2 U400.3 Y401.1 | length 11.4
  Top Layer w0.254: U400.3@209.4,119.475 211.525,119.475 214.4,116.6 215.5,116.6 215.75,116.35 C403.2@215.75,115.25
  Top Layer w0.5: C403.2@215.75,115.25 218.35,115.25 Y401.1@218.375,115.225
OSC32O: C404.2 U400.4 Y401.4 | length 11.4
  Top Layer w0.254: U400.4@209.4,119.975 211.732,119.975 214.607,117.1 215.4,117.1 215.75,117.45 C404.2@215.75,118.5
  Top Layer w0.5: C404.2@215.75,118.5 218.3,118.5 Y401.4@218.375,118.425
OSCI: C401.2 U400.5 Y400.1 | length 13.4
  Top Layer w0.254: U400.5@209.4,120.475 213.682,120.475 214.75,121.543 214.75,124.25 215,124.5 215.25,124.5 C401.2@215.75,124
  Top Layer w0.5: C401.2@215.75,124 217.15,124 Y400.1@218.675,122.475
OSCO: C400.2 U400.6 Y400.2 | length 13.4
  Top Layer w0.254: U400.6@209.4,120.975 213.475,120.975 214.25,121.75 214.25,124.457 214.793,125 215.25,125 C400.2@215.75,125.5
  Top Layer w0.5: C400.2@215.75,125.5 217.15,125.5 Y400.2@218.675,127.025
SIM.CLK: 700.32 C708.2 R713.1 | length 39.5
  Top Layer w0.254: v1(195.5,160) 700.32@197,160 ; C708.2@210.75,134.25 v1(211.75,134.25) R713.1@212.75,134.25
  Bottom Layer w0.254: v1(195.5,160) 200.5,160 212.5,148 212.5,135 v1(211.75,134.25)
SIM.DATA: 700.31 C709.2 R715.1 | length 46.4
  Top Layer w0.254: v1(195.5,161) 700.31@197,161 ; C709.2@210.75,135.5 v1(211.75,135.5) R715.1@212.75,135.5
  Bottom Layer w0.254: v1(195.5,161) 200.543,161 213.25,148.293 213.25,134 212.5,133.25 211.25,133.25 210.75,133.75 210.75,135.25 211,135.5 v1(211.75,135.5)
SIM.DET: 700.34 R714.1 R716.1 | length 29.7
  Top Layer w0.254: v1(195.5,158) 700.34@197,158 ; R714.1@209.75,139.25 R716.1@209.75,140.5 v1(209.75,141.5)
  Bottom Layer w0.254: v1(195.5,158) 200.5,158 210.5,148 210.5,142.25 v1(209.75,141.5)
SIM.RST: 700.33 C707.2 R712.1 | length 35.4
  Top Layer w0.254: v1(195.5,159) 700.33@197,159 ; C707.2@210.75,136.75 v1(211.75,136.75) R712.1@212.75,136.75
  Bottom Layer w0.254: v1(195.5,159) 200.5,159 211.75,147.75 v1(211.75,136.75)
SIM.VDD: 700.30 C706.2 H700.1 U701.4 | length 55.7
  Top Layer w0.35: H700.1@215.5,139.27 219.02,139.27 220.25,140.5 220.25,146.5 221.65,147.9 U701.4@223.45,147.9
  Top Layer w0.5: v1(195.5,162) 700.30@197,162 ; C706.2@210.75,138 213.023,138 214.293,139.27 H700.1@215.5,139.27
  Bottom Layer w0.5: v1(195.5,162) 201.25,162 214.25,149 v1(214.25,139.235)
SOLAR_TOP: D904.1 R900.2 R.1 RV900.2 RV900.3 T902.1 | length 42.7
  Top Layer w0.5: T902.1@150.52,114.503 150.525,114.503 151.775,115.753 151.775,116.275 153.2,117.7 153.975,117.7 R.1@154.025,117.75 ; RV900.3@165.04,110.5 R900.2@168.25,110.5
  Top Layer w1: T902.1@150.525,114.503 153.497,114.503 156.75,111.25 156.75,109.25 158.75,107.25 161.5,107.25 162.5,108.25 RV900.2@162.5,110.5
  Top Layer w1.5: v3(157,122.5) D904.1@157,124.7 ; RV900.2@162.5,110.5 RV900.3@165.04,110.5
  Bottom Layer w1.5: T902.1@150.52,114.503 150.77,114.503 157,120.733 v3(157,122.5)
UART2.RX: 700.10 R702.1 U700.2 | length 52.1
  Top Layer w0.254: U700.2@191.025,161.95 191.025,162.925 v1(191.75,163.65) R702.1@191.75,164.25 ; 700.10@208,178 208,180.359 208.4,180.758 v1(208.4,180.825)
  Bottom Layer w0.254: v1(191.75,163.65) 191.75,163.225 190.55,162.025 187.425,162.025 184.925,164.525 184.925,177.27 187.905,180.25 207.825,180.25 v1(208.4,180.825)
UART2.TX: 700.9 R701.1 U700.3 | length 48.1
  Top Layer w0.254: U700.3@190.375,161.95 v1(190.375,163.075) 190.75,163.45 R701.1@190.75,164.25 ; 700.9@209,178 209,180.034 209.187,180.22 v1(209.187,180.287)
  Bottom Layer w0.254: v1(190.375,163.075) 189.875,162.575 187.85,162.575 185.475,164.95 185.475,177.042 188.133,179.7 208.6,179.7 v1(209.187,180.287)
USB.BOOT: 700.6 R700.2 | length 5.5
  Top Layer w0.254: R700.2@210,182 210,179.9 210.5,179.4 211.65,179.4 212,179.05 700.6@212,178
USB.DN: 700.28 P700.2 | length 13.6
  Top Layer w0.254: P700.2@188.5,170.25 189.45,171.2 191.5,171.2 193.3,169.4 193.3,166.5 195.8,164 700.28@197,164
USB.DP: 700.27 P700.3 | length 13.5
  Top Layer w0.254: P700.3@188.5,172.79 189.49,171.8 191.8,171.8 193.9,169.7 193.9,166.7 195.6,165 700.27@197,165
USB.VBUS: 700.24 C701.1 P700.1 | length 9.5
  Top Layer w0.5: P700.1@188.5,167.71 188.54,167.75 C701.1@191.25,167.75 v1(191.25,168.5) ; v1(195.2,168) 700.24@197,168
  Bottom Layer w0.5: v1(191.25,168.5) 191.75,168 v1(195.2,168)
V_BAT: D903.1 D.2 P800.1 R802.2 T800.2 | length 17
  Top Layer w0.5: P800.1@145.225,141.415 145.25,141.44 R802.2@145.25,148
  Top Layer w1: P800.1@145.225,141.415 147.75,138.89 147.75,135.3 148.425,134.625 D.2@148.425,132.481
  Bottom Layer w1.5: P800.1@145.225,141.415 P800.1@145.325,141.515
V_SOLAR: C802.1 D800.1 D900.2 D901.1 D902.2 D904.2 D905.2 D906.2 R800.2 | length 48.6
  Top Layer w0.5: D906.2@163,129.3 163,129.1 163.75,128.35 163.95,128.35 164.05,128.25 166.05,128.25 166.8,127.5 166.8,114 168.3,112.5 172.8,112.5 173.25,112.05 173.25,110.55 R800.2@173.25,110.5
  Top Layer w1.5: D900.2@151,129.3 D902.2@154,129.3 D904.2@157,129.3 D905.2@160,129.3 D906.2@163,129.3 D901.1@163,132.071 ; C802.1@155.3,133 155.325,132.975 161.225,132.975 161.25,132.95 D901.1@162.121,132.95
V_SYSTEM: D901.2 D903.2 F200.1
VBAT: BT400.1 R402.1 | length 17.8
  Top Layer w0.5: v1(214.5,113.3) R402.1@214.5,114.25
  Bottom Layer w0.5: v1(214.5,113.3) 216.8,111 226.575,111 BT400.1@228.775,113.2 BT400.1@229.525,113.2
VIN: F200.2 L200.1 R603.1 U601.3 U601.5 | length 36.7
  Bottom Layer w1.5: v3(150.5,159) v3(150.5,157.25) 150.5,155.25 151.75,154 v3(155.5,154) v3(157.25,154) v3(159,154) 159,148.5 160.75,146.75 v3(173.5,146.75) v3(175.25,146.75) v3(176.75,146.75)
VOUT: C202.2 C203.1 L201.2 L202.1 L203.1 L700.1 R202.2 | length 59.9
  Top Layer w0.254: R202.2@179.25,140.5 v1(180.25,140.5)
  Top Layer w0.6: L203.1@169,116.475 L202.1@170.75,116.475
  Top Layer w0.9: v3(192.525,147.627) L700.1@192.525,149
  Bottom Layer w0.5: v1(180.25,140.5) 187.25,140.5
  Bottom Layer w1.5: v1(168.25,117.5) v1(169.5,117.5) 182,117.5 183.75,119.25 v3(183.75,122) v3(185,122) 187.25,124.25 187.25,140.5 187.25,141.75 192,146.5 192,147.7
  other v1: 170.75,117.5
pads on no net: 700.5 700.7 700.8 700.11 700.12 700.13 700.14 700.19 700.20 700.21 700.22 700.23 700.25 700.26 700.35 700.36 700.37 700.38 700.40 700.41 700.42 700.43 700.44 700.47 700.48 700.49 700.50 700.51 700.52 700.53 700.67 700.68 700.90 700.93 700.95 700.96 700.97 700.98 700.99 700.100 700.101 700.102 700.103 700.104 700.105 700.106 700.107 700.108 700.109 700.110 700.111 700.112 700.113 700.114 700.115 700.116 700.117 700.118 700.119 700.120 700.121 700.122 700.123 700.124 BT400. H700.6 MD500.7 MD500.13 MD500.14 MD500.15 MD500.16 MD500.17 MD500.18 MD500.19 MD500.20 MD500.21 MD500.22 MD500.23 MD500.24 MD500.25 MD500.26 MD500.27 P100.1 P100.2 Q700.1@206.25,151.266 Q701.1@200.25,151.266 T500.1@165.016,99.7 T601.1@185.384,184.425 T700.1@208.016,183.5 T701.1@214.016,183.5 T801.1@153.85,137.766 U400.0 U400.2 U400.40 U700.7 U700.8 U700.9 U700.11 U700.12 U700.13 U701.0 Y401.2 Y401.3

## Polygon pours and split planes (outlines as drawn)
GND on Top Layer "GND_L02_P003" (solid, remove dead copper, pour order 8): 230.333,131.374 230.333,83.474 141.433,83.474 141.433,193.474 196.933,193.474 196.933,177.245 184.858,177.245 184.858,151.774 193.333,151.774 193.333,146.974 207.833,146.974 207.833,131.374
GSM.GND on Top Layer "GSM.GND_L01_P000" (solid, remove dead copper, pour order 5): 230.4,131.4 207.9,131.4 207.9,147 193.4,147 193.4,151.8 184.8,151.8 184.8,177.3 195.4,177.3 195.4,180.5 200.6,180.5 200.6,193.4 230.4,193.4 230.4,181.9
GND on Bottom Layer "GND_L02_P003" (solid, remove dead copper, pour order 7): 230.399,131.393 230.399,83.493 141.499,83.493 141.499,193.493 196.999,193.493 196.999,177.263 184.924,177.263 184.924,151.793 193.399,151.793 193.399,146.993 207.899,146.993 207.899,131.393
GSM.GND on Bottom Layer "GSM.GND_L02_P001" (solid, remove dead copper, pour order 6): 230.4,131.4 230.4,193.4 200.6,193.4 200.6,180.5 195.4,180.5 195.4,177.27 184.925,177.27 184.925,151.8 193.4,151.8 193.4,147 207.9,147 207.9,131.4

## Keep-outs
Keep-Out Layer:
  circle w0.254: c196.596,138.557 r55